# Altium PCB LEDControl1.PcbDoc (part 3 of 6)
Units mm, origin at the board's own origin, x right, y up, seen from the top; angles counter-clockwise.
Board outline 380 x 185 mm, 2 copper layers (Top Layer, Bottom Layer), stack 0.533 mm thick; 673 components, 368 nets, 1993 pads, 2553 vias.
Unrouted connection lines stored in the file: 1155.
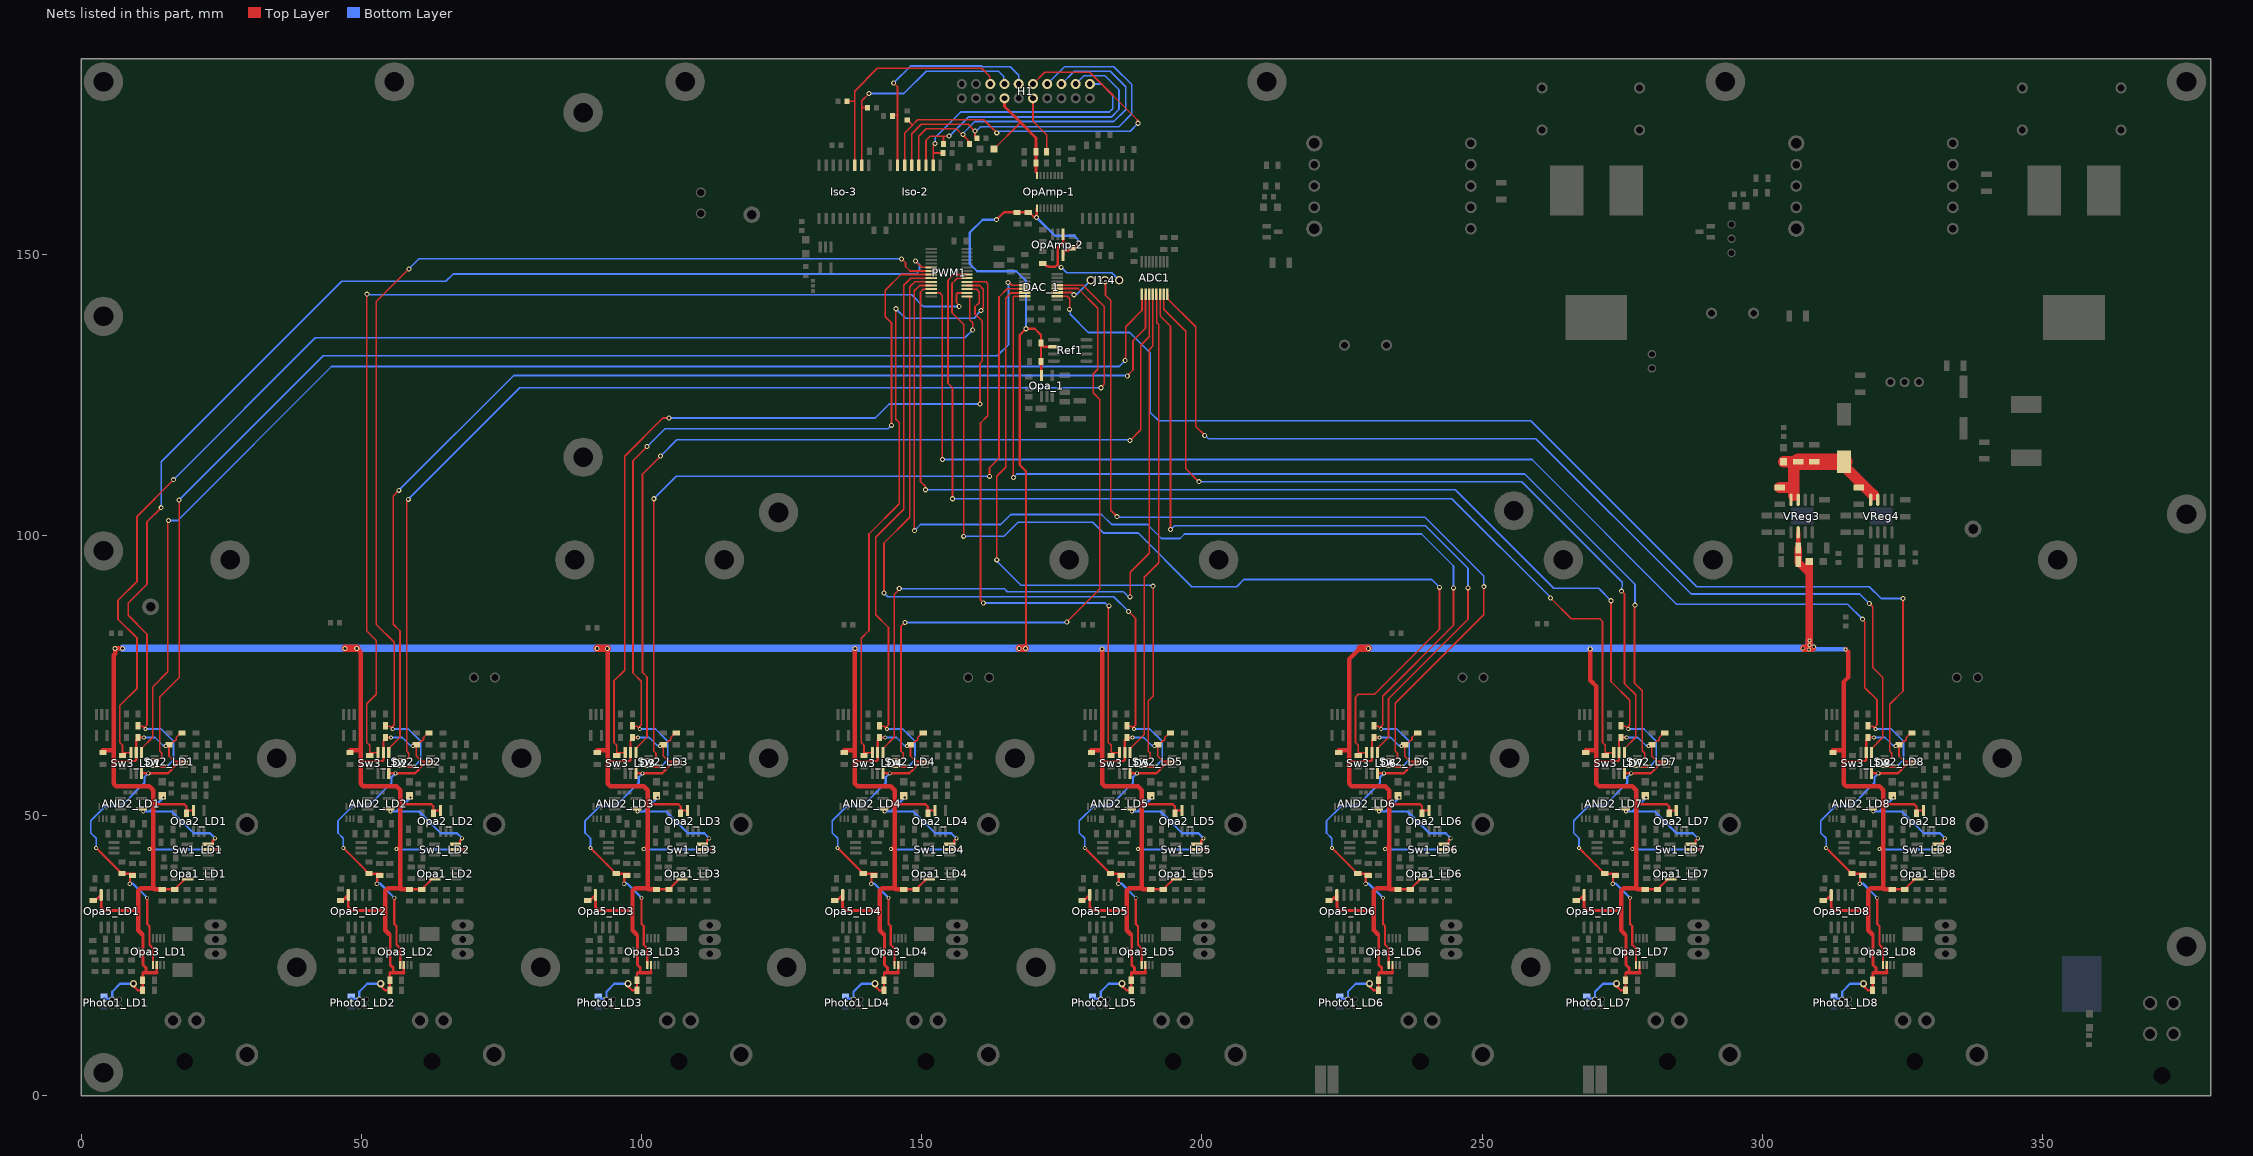
[diagram p3: the nets of this part, all layers, seen from the top]

## Via types
v1: diameter 0.7, hole 0.4, Top Layer to Bottom Layer, tented both sides, 1874 vias
v2: diameter 0.8, hole 0.5, Top Layer to Bottom Layer, tented both sides, 512 vias
v3: diameter 0.9, hole 0.5, Top Layer to Bottom Layer, tented both sides, 158 vias
v4: diameter 1.27, hole 0.711, Top Layer to Bottom Layer, tented both sides, 8 vias
v5: diameter 1.2, hole 0.7, Top Layer to Bottom Layer, tented both sides, 1 vias

## Nets (pads, with @x,y where several pads share a name; then routed paths per layer and width w, separated by ;. In a path a pad name is that pad's centre, name@x,y a point inside that pad or via, vN(x,y) a via of type N, cw(c..) or ccw(c..) an arc to the next point about the centre after c; other vN are vias at no path point) (continued)
5V: C1-7.1 C1-11.2 C1-16.2 C1-99.2 C2-17.2 C2-18.2 C3-1.1 C3-1_LD1.2 C3-1_LD2.2 C3-1_LD3.2 C3-1_LD4.2 C3-1_LD5.2 C3-1_LD6.2 C3-1_LD7.2 C3-1_LD8.2 C3-2_LD1.1 C3-2_LD2.1 C3-2_LD3.1 C3-2_LD4.1 C3-2_LD5.1 C3-2_LD6.1 C3-2_LD7.1 C3-2_LD8.1 C4-1_LD1.2 C4-1_LD2.2 C4-1_LD3.2 C4-1_LD4.2 C4-1_LD5.2 C4-1_LD6.2 C4-1_LD7.2 C4-1_LD8.2 C4-2_LD1.2 C4-2_LD2.2 C4-2_LD3.2 C4-2_LD4.2 C4-2_LD5.2 C4-2_LD6.2 C4-2_LD7.2 C4-2_LD8.2 C4-3_LD1.1 C4-3_LD2.1 C4-3_LD3.1 C4-3_LD4.1 C4-3_LD5.1 C4-3_LD6.1 C4-3_LD7.1 C4-3_LD8.1 C4-4_LD1.1 C4-4_LD2.1 C4-4_LD3.1 C4-4_LD4.1 C4-4_LD5.1 C4-4_LD6.1 C4-4_LD7.1 C4-4_LD8.1 C4-5_LD1.1 C4-5_LD2.1 C4-5_LD3.1 C4-5_LD4.1 C4-5_LD5.1 C4-5_LD6.1 C4-5_LD7.1 C4-5_LD8.1 C4-6_LD1.1 C4-6_LD2.1 C4-6_LD3.1 C4-6_LD4.1 C4-6_LD5.1 C4-6_LD6.1 C4-6_LD7.1 C4-6_LD8.1 C4-8_LD1.1 C4-8_LD2.1 C4-8_LD3.1 C4-8_LD4.1 C4-8_LD5.1 C4-8_LD6.1 C4-8_LD7.1 C4-8_LD8.1 C5-1_LD1.2 C5-1_LD2.2 C5-1_LD3.2 C5-1_LD4.2 C5-1_LD5.2 C5-1_LD6.2 C5-1_LD7.2 C5-1_LD8.2 LED1-5.2 Opa1_LD1.5 Opa1_LD2.5 Opa1_LD3.5 Opa1_LD4.5 Opa1_LD5.5 Opa1_LD6.5 Opa1_LD7.5 Opa1_LD8.5 Opa2_LD1.5 Opa2_LD2.5 Opa2_LD3.5 Opa2_LD4.5 Opa2_LD5.5 Opa2_LD6.5 Opa2_LD7.5 Opa2_LD8.5 Opa3_LD1.6 Opa3_LD2.6 Opa3_LD3.6 Opa3_LD4.6 Opa3_LD5.6 Opa3_LD6.6 Opa3_LD7.6 Opa3_LD8.6 Opa5_LD1.8 Opa5_LD2.8 Opa5_LD3.8 Opa5_LD4.8 Opa5_LD5.8 Opa5_LD6.8 Opa5_LD7.8 Opa5_LD8.8 Opa_1.5 OpAmp-1.1 OpAmp-2.5 Photo1_LD1.1 Photo1_LD2.1 Photo1_LD3.1 Photo1_LD4.1 Photo1_LD5.1 Photo1_LD6.1 Photo1_LD7.1 Photo1_LD8.1 R14-1_LD1.2 R14-1_LD2.2 R14-1_LD3.2 R14-1_LD4.2 R14-1_LD5.2 R14-1_LD6.2 R14-1_LD7.2 R14-1_LD8.2 Ref1.2 Sw1_LD1.5 Sw1_LD2.5 Sw1_LD3.5 Sw1_LD4.5 Sw1_LD5.5 Sw1_LD6.5 Sw1_LD7.5 Sw1_LD8.5 Sw2_LD1.8 Sw2_LD2.8 Sw2_LD3.8 Sw2_LD4.8 Sw2_LD5.8 Sw2_LD6.8 Sw2_LD7.8 Sw2_LD8.8 Sw3_LD1.5 Sw3_LD2.5 Sw3_LD3.5 Sw3_LD4.5 Sw3_LD5.5 Sw3_LD6.5 Sw3_LD7.5 Sw3_LD8.5 VReg3.2 | length 1666.6
  Top Layer w0.3: 5.8,59.8 5.9,59.7 ; C4-8_LD1.1@9.85,63.35 C4-8_LD1.1@9.9,63.4 ; C4-6_LD1.1@15.7,62.3 15.7,60.6 16.7,59.6 Sw2_LD1.8@18.3,59.6 ; C4-6_LD1.1@15.7,62.6 15.9,62.6 16.624,63.324 16.824,63.324 17,63.5 17,63.9 17.8,64.7 R14-1_LD1.2@18,64.7 ; 49.9,59.8 50,59.7 ; 49.9,62.625 49.925,62.6 ; C4-8_LD2.1@53.95,63.35 C4-8_LD2.1@54,63.4 ; C4-6_LD2.1@59.8,62.3 59.8,60.6 60.8,59.6 Sw2_LD2.8@62.4,59.6 ; C4-6_LD2.1@59.8,62.6 60,62.6 60.724,63.324 60.924,63.324 61.1,63.5 61.1,63.9 61.9,64.7 R14-1_LD2.2@62.1,64.7 ; 94,59.8 94.1,59.7 ; 94,62.625 94.025,62.6 ; C4-8_LD3.1@98.05,63.35 C4-8_LD3.1@98.1,63.4 ; C4-6_LD3.1@103.9,62.3 103.9,60.6 104.9,59.6 Sw2_LD3.8@106.5,59.6 ; C4-6_LD3.1@103.9,62.6 104.1,62.6 104.824,63.324 105.024,63.324 105.2,63.5 105.2,63.9 106,64.7 R14-1_LD3.2@106.2,64.7 ; 138.1,59.8 138.2,59.7 ; 138.1,62.625 138.125,62.6 ; C4-8_LD4.1@142.15,63.35 C4-8_LD4.1@142.2,63.4 ; C4-6_LD4.1@148,62.3 148,60.6 149,59.6 Sw2_LD4.8@150.6,59.6 ; C4-6_LD4.1@148,62.6 148.2,62.6 148.924,63.324 149.124,63.324 149.3,63.5 149.3,63.9 150.1,64.7 R14-1_LD4.2@150.3,64.7 ; 182.2,59.8 182.3,59.7 ; C4-8_LD5.1@186.25,63.35 C4-8_LD5.1@186.3,63.4 ; C4-6_LD5.1@192.1,62.3 192.1,60.6 193.1,59.6 Sw2_LD5.8@194.7,59.6 ; C4-6_LD5.1@192.1,62.6 192.3,62.6 193.024,63.324 193.224,63.324 193.4,63.5 193.4,63.9 194.2,64.7 R14-1_LD5.2@194.4,64.7 ; 226.3,59.8 226.4,59.7 ; C4-8_LD6.1@230.35,63.35 C4-8_LD6.1@230.4,63.4 ; C4-6_LD6.1@236.2,62.3 236.2,60.6 237.2,59.6 Sw2_LD6.8@238.8,59.6 ; C4-6_LD6.1@236.2,62.6 236.4,62.6 237.124,63.324 237.324,63.324 237.5,63.5 237.5,63.9 238.3,64.7 R14-1_LD6.2@238.5,64.7 ; 270.4,59.8 270.5,59.7 ; C4-8_LD7.1@274.45,63.35 C4-8_LD7.1@274.5,63.4 ; C4-6_LD7.1@280.3,62.3 280.3,60.6 281.3,59.6 Sw2_LD7.8@282.9,59.6 ; C4-6_LD7.1@280.3,62.6 280.5,62.6 281.224,63.324 281.424,63.324 281.6,63.5 281.6,63.9 282.4,64.7 R14-1_LD7.2@282.6,64.7 ; 314.5,59.8 314.6,59.7 ; C4-8_LD8.1@318.55,63.35 C4-8_LD8.1@318.6,63.4 ; C4-6_LD8.1@324.4,62.3 324.4,60.6 325.4,59.6 Sw2_LD8.8@327,59.6 ; C4-6_LD8.1@324.4,62.6 324.6,62.6 325.324,63.324 325.524,63.324 325.7,63.5 325.7,63.9 326.5,64.7 R14-1_LD8.2@326.7,64.7
  Top Layer w0.4: 5.9,59.7 9.674,59.7 9.85,59.876 Sw3_LD1.5@9.85,61.2 C4-8_LD1.1@9.85,63.35 ; v4(9.377,19.959) 9.543,19.792 9.543,19.393 10.136,18.8 C3-2_LD1.1@11,18.8 ; C4-8_LD1.1@10.2,63.9 v1(11.2,63.9) ; C3-2_LD1.1@11,19.1 C4-3_LD1.1@11,20.6 11,21.9 11.1,21.9 ; v1(12.2,44) 12.9,44.7 ; 12.9,51.7 13.2,52 18.4,52 18.8,51.6 C4-2_LD1.2@18.8,50.6 ; 13.5,21.9 Opa3_LD1.6@13.5,23.273 ; C4-1_LD1.2@14.5,36.8 C3-1_LD1.2@16.7,36.8 16.9,36.8 17.15,37.05 17.15,37.25 18.25,38.35 18.25,38.575 18.325,38.65 Opa1_LD1.5@19.05,38.65 ; C4-2_LD1.2@18.8,50.4 C4-2_LD1.2@18.8,50.6 ; Opa2_LD1.5@20.05,50.85 19.05,50.85 C4-2_LD1.2@18.8,50.6 ; Sw1_LD1.5@22.7,43.9 v1(24.6,43.9) ; 50,59.7 53.774,59.7 53.95,59.876 Sw3_LD2.5@53.95,61.2 C4-8_LD2.1@53.95,63.35 ; v4(53.477,19.959) 53.643,19.792 53.643,19.393 54.236,18.8 C3-2_LD2.1@55.1,18.8 ; C4-8_LD2.1@54.3,63.9 v1(55.3,63.9) ; C3-2_LD2.1@55.1,19.1 C4-3_LD2.1@55.1,20.6 55.1,21.9 55.2,21.9 ; v1(56.3,44) 57,44.7 ; 57,51.7 57.3,52 62.5,52 62.9,51.6 C4-2_LD2.2@62.9,50.6 ; 57.6,21.9 Opa3_LD2.6@57.6,23.273 ; C4-1_LD2.2@58.6,36.8 C3-1_LD2.2@60.8,36.8 61,36.8 61.25,37.05 61.25,37.25 62.35,38.35 62.35,38.575 62.425,38.65 Opa1_LD2.5@63.15,38.65 ; C4-2_LD2.2@62.9,50.4 C4-2_LD2.2@62.9,50.6 ; Opa2_LD2.5@64.15,50.85 63.15,50.85 C4-2_LD2.2@62.9,50.6 ; Sw1_LD2.5@66.8,43.9 v1(68.7,43.9) ; 94.1,59.7 97.874,59.7 98.05,59.876 Sw3_LD3.5@98.05,61.2 C4-8_LD3.1@98.05,63.35 ; v4(97.577,19.959) 97.743,19.792 97.743,19.393 98.336,18.8 C3-2_LD3.1@99.2,18.8 ; C4-8_LD3.1@98.4,63.9 v1(99.4,63.9) ; C3-2_LD3.1@99.2,19.1 C4-3_LD3.1@99.2,20.6 99.2,21.9 99.3,21.9 ; v1(100.4,44) 101.1,44.7 ; 101.1,51.7 101.4,52 106.6,52 107,51.6 C4-2_LD3.2@107,50.6 ; 101.7,21.9 Opa3_LD3.6@101.7,23.273 ; C4-1_LD3.2@102.7,36.8 C3-1_LD3.2@104.9,36.8 105.1,36.8 105.35,37.05 105.35,37.25 106.45,38.35 106.45,38.575 106.525,38.65 Opa1_LD3.5@107.25,38.65 ; C4-2_LD3.2@107,50.4 C4-2_LD3.2@107,50.6 ; Opa2_LD3.5@108.25,50.85 107.25,50.85 C4-2_LD3.2@107,50.6 ; Sw1_LD3.5@110.9,43.9 v1(112.8,43.9) ; 138.2,59.7 141.974,59.7 142.15,59.876 Sw3_LD4.5@142.15,61.2 C4-8_LD4.1@142.15,63.35 ; v4(141.677,19.959) 141.843,19.792 141.843,19.393 142.436,18.8 C3-2_LD4.1@143.3,18.8 ; C4-8_LD4.1@142.5,63.9 v1(143.5,63.9) ; C3-2_LD4.1@143.3,19.1 C4-3_LD4.1@143.3,20.6 143.3,21.9 143.4,21.9 ; v1(144.5,44) 145.2,44.7 ; 145.2,51.7 145.5,52 150.7,52 151.1,51.6 C4-2_LD4.2@151.1,50.6 ; 145.8,21.9 Opa3_LD4.6@145.8,23.273 ; C4-1_LD4.2@146.8,36.8 C3-1_LD4.2@149,36.8 149.2,36.8 149.45,37.05 149.45,37.25 150.55,38.35 150.55,38.575 150.625,38.65 Opa1_LD4.5@151.35,38.65 ; C4-2_LD4.2@151.1,50.4 C4-2_LD4.2@151.1,50.6 ; Opa2_LD4.5@152.35,50.85 151.35,50.85 C4-2_LD4.2@151.1,50.6 ; Sw1_LD4.5@155,43.9 v1(156.9,43.9) ; v3(163.372,156.29) 164.682,157.6 C3-1.1@167,157.6 C1-7.1@169,157.6 169.2,157.6 170.004,156.796 170.404,156.796 v3(170.5,156.7) 170.551,156.751 170.551,158.319 OpAmp-1.1@170.56,158.329 ; v3(168.5,79.8) 168.6,79.9 168.6,111.4 167.5,112.5 167.5,135.734 v3(168.6,136.834) 170.166,136.834 171.3,135.7 C1-11.2@171.3,134.3 C1-11.2@171.3,134.1 ; Opa_1.5@171.4,128.5 171.35,128.55 171.35,130.95 C1-16.2@171.3,131 C1-11.2@171.3,134.1 ; Ref1.2@173.6,133.6 171.8,133.6 C1-11.2@171.3,134.1 ; OpAmp-2.5@175.25,149.95 175.25,150.675 175.325,150.75 176.05,150.75 176.25,150.95 176.65,150.95 C1-99.2@176.9,151.2 177.1,151.2 v3@177.704,151.804 ; 182.3,59.7 186.074,59.7 186.25,59.876 Sw3_LD5.5@186.25,61.2 C4-8_LD5.1@186.25,63.35 ; v4(185.777,19.959) 185.943,19.792 185.943,19.393 186.536,18.8 C3-2_LD5.1@187.4,18.8 ; C4-8_LD5.1@186.6,63.9 v1(187.6,63.9) ; C3-2_LD5.1@187.4,19.1 C4-3_LD5.1@187.4,20.6 187.4,21.9 187.5,21.9 ; v1(188.6,44) 189.3,44.7 ; 189.3,51.7 189.6,52 194.8,52 195.2,51.6 C4-2_LD5.2@195.2,50.6 ; 189.9,21.9 Opa3_LD5.6@189.9,23.273 ; C4-1_LD5.2@190.9,36.8 C3-1_LD5.2@193.1,36.8 193.3,36.8 193.55,37.05 193.55,37.25 194.65,38.35 194.65,38.575 194.725,38.65 Opa1_LD5.5@195.45,38.65 ; C4-2_LD5.2@195.2,50.4 C4-2_LD5.2@195.2,50.6 ; Opa2_LD5.5@196.45,50.85 195.45,50.85 C4-2_LD5.2@195.2,50.6 ; Sw1_LD5.5@199.1,43.9 v1(201,43.9) ; 226.4,59.7 230.174,59.7 230.35,59.876 Sw3_LD6.5@230.35,61.2 C4-8_LD6.1@230.35,63.35 ; v4(229.877,19.959) 230.043,19.792 230.043,19.393 230.636,18.8 C3-2_LD6.1@231.5,18.8 ; C4-8_LD6.1@230.7,63.9 v1(231.7,63.9) ; C3-2_LD6.1@231.5,19.1 C4-3_LD6.1@231.5,20.6 231.5,21.9 231.6,21.9 ; v1(232.7,44) 233.4,44.7 ; 233.4,51.7 233.7,52 238.9,52 239.3,51.6 C4-2_LD6.2@239.3,50.6 ; 234,21.9 Opa3_LD6.6@234,23.273 ; C4-1_LD6.2@235,36.8 C3-1_LD6.2@237.2,36.8 237.4,36.8 237.65,37.05 237.65,37.25 238.75,38.35 238.75,38.575 238.825,38.65 Opa1_LD6.5@239.55,38.65 ; C4-2_LD6.2@239.3,50.4 C4-2_LD6.2@239.3,50.6 ; Opa2_LD6.5@240.55,50.85 239.55,50.85 C4-2_LD6.2@239.3,50.6 ; Sw1_LD6.5@243.2,43.9 v1(245.1,43.9) ; 270.5,59.7 274.274,59.7 274.45,59.876 Sw3_LD7.5@274.45,61.2 C4-8_LD7.1@274.45,63.35 ; v4(273.977,19.959) 274.143,19.792 274.143,19.393 274.736,18.8 C3-2_LD7.1@275.6,18.8 ; C4-8_LD7.1@274.8,63.9 v1(275.8,63.9) ; C3-2_LD7.1@275.6,19.1 C4-3_LD7.1@275.6,20.6 275.6,21.9 275.7,21.9 ; v1(276.8,44) 277.5,44.7 ; 277.5,51.7 277.8,52 283,52 283.4,51.6 C4-2_LD7.2@283.4,50.6 ; 278.1,21.9 Opa3_LD7.6@278.1,23.273 ; C4-1_LD7.2@279.1,36.8 C3-1_LD7.2@281.3,36.8 281.5,36.8 281.75,37.05 281.75,37.25 282.85,38.35 282.85,38.575 282.925,38.65 Opa1_LD7.5@283.65,38.65 ; C4-2_LD7.2@283.4,50.4 C4-2_LD7.2@283.4,50.6 ; Opa2_LD7.5@284.65,50.85 283.65,50.85 C4-2_LD7.2@283.4,50.6 ; Sw1_LD7.5@287.3,43.9 v1(289.2,43.9) ; 314.6,59.7 318.374,59.7 318.55,59.876 Sw3_LD8.5@318.55,61.2 C4-8_LD8.1@318.55,63.35 ; v4(318.077,19.959) 318.243,19.792 318.243,19.393 318.836,18.8 C3-2_LD8.1@319.7,18.8 ; C4-8_LD8.1@318.9,63.9 v1(319.9,63.9) ; C3-2_LD8.1@319.7,19.1 C4-3_LD8.1@319.7,20.6 319.7,21.9 319.8,21.9 ; v1(320.9,44) 321.6,44.7 ; 321.6,51.7 321.9,52 327.1,52 327.5,51.6 C4-2_LD8.2@327.5,50.6 ; 322.2,21.9 Opa3_LD8.6@322.2,23.273 ; C4-1_LD8.2@323.2,36.8 C3-1_LD8.2@325.4,36.8 325.6,36.8 325.85,37.05 325.85,37.25 326.95,38.35 326.95,38.575 327.025,38.65 Opa1_LD8.5@327.75,38.65 ; C4-2_LD8.2@327.5,50.4 C4-2_LD8.2@327.5,50.6 ; Opa2_LD8.5@328.75,50.85 327.75,50.85 C4-2_LD8.2@327.5,50.6 ; Sw1_LD8.5@331.4,43.9 v1(333.3,43.9)
  Top Layer w0.5: C4-5_LD1.1@2.1,34.7 ccw(c2.1,35.642) 2.766,34.976 Opa5_LD1.8@3.59,35.8 3.59,33.61 4.184,33.016 10.2,33.016 ; 10.9,28.8 11.075,28.625 11.075,23.325 11.6,22.8 11.6,21.9 ; C4-5_LD2.1@46.2,34.7 ccw(c46.2,35.642) 46.866,34.976 Opa5_LD2.8@47.69,35.8 47.69,33.61 48.284,33.016 54.3,33.016 ; 55,28.8 55.175,28.625 55.175,23.325 55.7,22.8 55.7,21.9 ; C4-5_LD3.1@90.3,34.7 ccw(c90.3,35.642) 90.966,34.976 Opa5_LD3.8@91.79,35.8 91.79,33.61 92.384,33.016 98.4,33.016 ; 99.1,28.8 99.275,28.625 99.275,23.325 99.8,22.8 99.8,21.9 ; C4-5_LD4.1@134.4,34.7 ccw(c134.4,35.642) 135.066,34.976 Opa5_LD4.8@135.89,35.8 135.89,33.61 136.484,33.016 142.5,33.016 ; 143.2,28.8 143.375,28.625 143.375,23.325 143.9,22.8 143.9,21.9 ; C4-5_LD5.1@178.5,34.7 ccw(c178.5,35.642) 179.166,34.976 Opa5_LD5.8@179.99,35.8 179.99,33.61 180.584,33.016 186.6,33.016 ; 187.3,28.8 187.475,28.625 187.475,23.325 188,22.8 188,21.9 ; C4-5_LD6.1@222.6,34.7 ccw(c222.6,35.642) 223.266,34.976 Opa5_LD6.8@224.09,35.8 224.09,33.61 224.684,33.016 230.7,33.016 ; 231.4,28.8 231.575,28.625 231.575,23.325 232.1,22.8 232.1,21.9 ; C4-5_LD7.1@266.7,34.7 ccw(c266.7,35.642) 267.366,34.976 Opa5_LD7.8@268.19,35.8 268.19,33.61 268.784,33.016 274.8,33.016 ; 275.5,28.8 275.675,28.625 275.675,23.325 276.2,22.8 276.2,21.9 ; C4-5_LD8.1@310.8,34.7 ccw(c310.8,35.642) 311.466,34.976 Opa5_LD8.8@312.29,35.8 312.29,33.61 312.884,33.016 318.9,33.016 ; 319.6,28.8 319.775,28.625 319.775,23.325 320.3,22.8 320.3,21.9
  Top Layer w0.6: 11.1,21.9 11.6,21.9 13.5,21.9 ; 55.2,21.9 55.7,21.9 57.6,21.9 ; 99.3,21.9 99.8,21.9 101.7,21.9 ; 143.4,21.9 143.9,21.9 145.8,21.9 ; 187.5,21.9 188,21.9 189.9,21.9 ; 231.6,21.9 232.1,21.9 234,21.9 ; 275.7,21.9 276.2,21.9 278.1,21.9 ; 319.8,21.9 320.3,21.9 322.2,21.9
  Top Layer w0.8: C5-1_LD1.2@3.9,61.6 5.7,61.6 5.8,61.7 ; v3(7.4,79.8) 7.39,79.79 6.09,79.79 v3(6.081,79.781) 6.081,78.881 5.8,78.6 5.8,61.7 ; 10.9,28.8 10.2,29.5 10.2,33.016 10.2,36.531 10.669,37 12.9,37 ; C4-1_LD1.2@14.5,36.8 14.45,36.85 13.05,36.85 12.9,37 ; C5-1_LD2.2@48,61.6 49.8,61.6 49.9,61.7 ; v3(49.2,79.8) 49.9,79.1 49.9,62.625 49.9,61.7 ; 55,28.8 54.3,29.5 54.3,33.016 54.3,36.531 54.769,37 57,37 ; C4-1_LD2.2@58.6,36.8 58.55,36.85 57.15,36.85 57,37 ; C5-1_LD3.2@92.1,61.6 93.9,61.6 94,61.7 ; v3(93.9,79.8) 94,79.7 94,62.625 94,61.7 ; 99.1,28.8 98.4,29.5 98.4,33.016 98.4,36.531 98.869,37 101.1,37 ; C4-1_LD3.2@102.7,36.8 102.65,36.85 101.25,36.85 101.1,37 ; C5-1_LD4.2@136.2,61.6 138,61.6 138.1,61.7 ; v3(138.1,79.8) 138.2,79.8 138.1,79.7 138.1,62.625 138.1,61.7 ; 143.2,28.8 142.5,29.5 142.5,33.016 142.5,36.531 142.969,37 145.2,37 ; C4-1_LD4.2@146.8,36.8 146.75,36.85 145.35,36.85 145.2,37 ; C5-1_LD5.2@180.3,61.6 182.1,61.6 182.2,61.7 ; v3(182.2,79.7) 182.2,61.7 ; 187.3,28.8 186.6,29.5 186.6,33.016 186.6,36.531 187.069,37 189.3,37 ; C4-1_LD5.2@190.9,36.8 190.85,36.85 189.45,36.85 189.3,37 ; C5-1_LD6.2@224.4,61.6 226.2,61.6 226.3,61.7 ; 228.25,79.8 228.2,79.8 226.3,77.9 226.3,61.7 ; 231.4,28.8 230.7,29.5 230.7,33.016 230.7,36.531 231.169,37 233.4,37 ; C4-1_LD6.2@235,36.8 234.95,36.85 233.55,36.85 233.4,37 ; C5-1_LD7.2@268.5,61.6 270.3,61.6 270.4,61.7 ; v3(269.3,79.7) 269.3,74.1 270.4,73 270.4,61.7 ; 275.5,28.8 274.8,29.5 274.8,33.016 274.8,36.531 275.269,37 277.5,37 ; C4-1_LD7.2@279.1,36.8 279.05,36.85 277.65,36.85 277.5,37 ; C2-18.2@306.4,97.7 VReg3.2@306.4,100.5 ; C5-1_LD8.2@312.6,61.6 314.4,61.6 314.5,61.7 ; v1(314.856,79.6) 315.3,79.156 315.3,74.6 314.5,73.8 314.5,61.7 ; 319.6,28.8 318.9,29.5 318.9,33.016 318.9,36.531 319.369,37 321.6,37 ; C4-1_LD8.2@323.2,36.8 323.15,36.85 321.75,36.85 321.6,37 ; 5.8,61.7 5.8,59.8 5.8,55.669 6.269,55.2 12.2,55.2 12.9,54.5 12.9,51.7 12.9,44.7 12.9,37 ; 49.9,61.7 49.9,59.8 49.9,55.669 50.369,55.2 56.3,55.2 57,54.5 57,51.7 57,44.7 57,37 ; 94,61.7 94,59.8 94,55.669 94.469,55.2 100.4,55.2 101.1,54.5 101.1,51.7 101.1,44.7 101.1,37 ; 138.1,61.7 138.1,59.8 138.1,55.669 138.569,55.2 144.5,55.2 145.2,54.5 145.2,51.7 145.2,44.7 145.2,37 ; 182.2,61.7 182.2,59.8 182.2,55.669 182.669,55.2 188.6,55.2 189.3,54.5 189.3,51.7 189.3,44.7 189.3,37 ; 226.3,61.7 226.3,59.8 226.3,55.669 226.769,55.2 232.7,55.2 233.4,54.5 233.4,51.7 233.4,44.7 233.4,37 ; 270.4,61.7 270.4,59.8 270.4,55.669 270.869,55.2 276.8,55.2 277.5,54.5 277.5,51.7 277.5,44.7 277.5,37 ; 314.5,61.7 314.5,59.8 314.5,55.669 314.969,55.2 320.9,55.2 321.6,54.5 321.6,52 321.6,51.7 321.6,44.7 321.6,37
  Top Layer w1.3: v3(47.1,79.8) v3(49.2,79.8) ; v3(92.1,79.8) v3(93.9,79.8) v3@93.95,79.75 ; v3(167.4,79.8) 167.7,79.8 v3(168.5,79.8) ; 228.25,79.8 v3(229.7,79.8) ; C2-18.2@306.4,97.7 C2-17.2@306.4,95.3 306.4,95.15 308.15,93.4 308.4,93.4 ; v1@307.4,79.8 308.9,79.8 ; v1@308.4,79.8 308.4,93.4 ; LED1-5.2@308.4,95.3 308.4,93.4
  Bottom Layer w0.3: v1(11.2,63.9) 13.2,63.9 14.634,62.466 15.034,62.466 v1(15.1,62.4) ; v1(55.3,63.9) 57.3,63.9 58.734,62.466 59.134,62.466 v1(59.2,62.4) ; v1(99.4,63.9) 101.4,63.9 102.834,62.466 103.234,62.466 v1(103.3,62.4) ; v1(143.5,63.9) 145.5,63.9 146.934,62.466 147.334,62.466 v1(147.4,62.4) ; v1(187.6,63.9) 189.6,63.9 191.034,62.466 191.434,62.466 v1(191.5,62.4) ; v1(231.7,63.9) 233.7,63.9 235.134,62.466 235.534,62.466 v1(235.6,62.4) ; v1(275.8,63.9) 277.8,63.9 279.234,62.466 279.634,62.466 v1(279.7,62.4) ; v1(319.9,63.9) 321.9,63.9 323.334,62.466 323.734,62.466 v1(323.8,62.4)
  Bottom Layer w0.4: C4-4_LD1.1@4.1,17.5 4.335,17.265 5.435,17.265 Photo1_LD1.1@5.55,17.15 5.55,18.55 6.959,19.959 v4(9.377,19.959) ; v1(12.2,44) 12.281,44 12.381,43.9 v1(24.6,43.9) ; C4-4_LD2.1@48.2,17.5 48.435,17.265 49.535,17.265 Photo1_LD2.1@49.65,17.15 49.65,18.55 51.059,19.959 v4(53.477,19.959) ; v1(56.3,44) 56.381,44 56.481,43.9 v1(68.7,43.9) ; C4-4_LD3.1@92.3,17.5 92.535,17.265 93.635,17.265 Photo1_LD3.1@93.75,17.15 93.75,18.55 95.159,19.959 v4(97.577,19.959) ; v1(100.4,44) 100.481,44 100.581,43.9 v1(112.8,43.9) ; C4-4_LD4.1@136.4,17.5 136.635,17.265 137.735,17.265 Photo1_LD4.1@137.85,17.15 137.85,18.55 139.259,19.959 v4(141.677,19.959) ; v1(144.5,44) 144.581,44 144.681,43.9 v1(156.9,43.9) ; v3(163.372,156.29) 160.89,156.29 158.6,154 158.6,148.4 159.9,147.1 166.9,147.1 168.6,145.4 v3(168.6,136.834) ; v3(170.5,156.7) 173.793,153.407 177.213,153.407 177.904,152.716 177.904,151.996 v3@178,151.9 ; C4-4_LD5.1@180.5,17.5 180.735,17.265 181.835,17.265 Photo1_LD5.1@181.95,17.15 181.95,18.55 183.359,19.959 v4(185.777,19.959) ; v1(188.6,44) 188.681,44 188.781,43.9 v1(201,43.9) ; C4-4_LD6.1@224.6,17.5 224.835,17.265 225.935,17.265 Photo1_LD6.1@226.05,17.15 226.05,18.55 227.459,19.959 v4(229.877,19.959) ; v1(232.7,44) 232.781,44 232.881,43.9 v1(245.1,43.9) ; C4-4_LD7.1@268.7,17.5 268.935,17.265 270.035,17.265 Photo1_LD7.1@270.15,17.15 270.15,18.55 271.559,19.959 v4(273.977,19.959) ; v1(276.8,44) 276.881,44 276.981,43.9 v1(289.2,43.9) ; C4-4_LD8.1@312.8,17.5 313.035,17.265 314.135,17.265 Photo1_LD8.1@314.25,17.15 314.25,18.55 315.659,19.959 v4(318.077,19.959) ; v1(320.9,44) 320.981,44 321.081,43.9 v1(333.3,43.9)
  Bottom Layer w0.8: v3(6.081,79.781) 6.1,79.8 6.11,79.79 7.39,79.79 v3(7.4,79.8) ; v1@309,79.9 309.3,79.6 v1(314.856,79.6)
  Bottom Layer w1.3: v3(7.4,79.8) v3(47.1,79.8) ; 267.7,79.8 v3(229.7,79.8) 228.3,79.8 182.2,79.8 v3(168.5,79.8) v3(167.4,79.8) 167.3,79.8 v3(138.1,79.8) v3(93.9,79.8) v3(92.1,79.8) v3(49.2,79.8) ; 267.727,79.827 v3@269.273,79.827 ; v3@269.3,79.8 v1@309.15,79.8 ; v1(308.4,80.4) v1(308.4,81.2) ; v3(47.1,79.8) v3(49.2,79.8) ; v3(47.1,79.8) v3(49.2,79.8)
  other v1: 308.3,79.6 307.2,79.8 309.2,80.1
  other v3: 178.1,152
5V_IN: C1-8.2 C3-2.2 H1.17 LED-8.2 OpAmp-1.16 | length 23
  Top Layer w0.3: LED-8.2@162.9,168.9 167.5,173.5 167.8,173.5 ; OpAmp-1.16@170.4,164.775 170.56,164.615 OpAmp-1.16@170.56,164.171
  Top Layer w0.5: H1.17@164.78,177.96 164.78,176.52 167.8,173.5 170.4,170.9 C3-2.2@170.4,168.4 C1-8.2@170.4,166.4 OpAmp-1.16@170.4,164.775
6V5: C2-6.1 C2-15.1 C2-21.1 F1.2 LED1-6.2 R6-1.2 VReg3.7 VReg3.8 VReg4.7 VReg4.8 | length 27.8
  Top Layer w2: C2-21.1@303.1,108.5 305.5,108.5 305.6,108.4 ; LED1-6.2@303.8,113.1 304.6,113.1 R6-1.2@306.4,113.1 305.6,112.3 305.6,108.4 ; 305.6,107.1 305.6,108.4 ; F1.2@314.6,113.1 314.6,112.35 319.75,107.2 319.8,107.2
  Top Layer w3: R6-1.2@306.4,113.1 C2-15.1@309.3,113.1 F1.2@314.6,113.1
Active_LD1: AND2_LD1.4 LEDC_1_LD1.2 Sw1_LD1.6 | length 20.3
  Top Layer w0.4: Sw1_LD1.6@22.7,44.85 23.425,44.85 23.5,44.925 23.5,45.5 v1(23.9,45.9)
  Bottom Layer w0.4: v1(11.1,50.7) 12.2,50.7 ; v1(14.7,53.2) 12.2,50.7 ; v1(23.9,45.9) 23,46.8 20.1,46.8 16.2,50.7 12.2,50.7
Active_LD2: AND2_LD2.4 LEDC_1_LD2.2 Sw1_LD2.6 | length 20.3
  Top Layer w0.4: Sw1_LD2.6@66.8,44.85 67.525,44.85 67.6,44.925 67.6,45.5 v1(68,45.9)
  Bottom Layer w0.4: v1(55.2,50.7) 56.3,50.7 ; v1(58.8,53.2) 56.3,50.7 ; v1(68,45.9) 67.1,46.8 64.2,46.8 60.3,50.7 56.3,50.7
Active_LD3: AND2_LD3.4 LEDC_1_LD3.2 Sw1_LD3.6 | length 20.3
  Top Layer w0.4: Sw1_LD3.6@110.9,44.85 111.625,44.85 111.7,44.925 111.7,45.5 v1(112.1,45.9)
  Bottom Layer w0.4: v1(99.3,50.7) 100.4,50.7 ; v1(102.9,53.2) 100.4,50.7 ; v1(112.1,45.9) 111.2,46.8 108.3,46.8 104.4,50.7 100.4,50.7
Active_LD4: AND2_LD4.4 LEDC_1_LD4.2 Sw1_LD4.6 | length 20.3
  Top Layer w0.4: Sw1_LD4.6@155,44.85 155.725,44.85 155.8,44.925 155.8,45.5 v1(156.2,45.9)
  Bottom Layer w0.4: v1(143.4,50.7) 144.5,50.7 ; v1(147,53.2) 144.5,50.7 ; v1(156.2,45.9) 155.3,46.8 152.4,46.8 148.5,50.7 144.5,50.7
Active_LD5: AND2_LD5.4 LEDC_1_LD5.2 Sw1_LD5.6 | length 20.3
  Top Layer w0.4: Sw1_LD5.6@199.1,44.85 199.825,44.85 199.9,44.925 199.9,45.5 v1(200.3,45.9)
  Bottom Layer w0.4: v1(187.5,50.7) 188.6,50.7 ; v1(191.1,53.2) 188.6,50.7 ; v1(200.3,45.9) 199.4,46.8 196.5,46.8 192.6,50.7 188.6,50.7
Active_LD6: AND2_LD6.4 LEDC_1_LD6.2 Sw1_LD6.6 | length 20.3
  Top Layer w0.4: Sw1_LD6.6@243.2,44.85 243.925,44.85 244,44.925 244,45.5 v1(244.4,45.9)
  Bottom Layer w0.4: v1(231.6,50.7) 232.7,50.7 ; v1(235.2,53.2) 232.7,50.7 ; v1(244.4,45.9) 243.5,46.8 240.6,46.8 236.7,50.7 232.7,50.7
Active_LD7: AND2_LD7.4 LEDC_1_LD7.2 Sw1_LD7.6 | length 20.3
  Top Layer w0.4: Sw1_LD7.6@287.3,44.85 288.025,44.85 288.1,44.925 288.1,45.5 v1(288.5,45.9)
  Bottom Layer w0.4: v1(275.7,50.7) 276.8,50.7 ; v1(279.3,53.2) 276.8,50.7 ; v1(288.5,45.9) 287.6,46.8 284.7,46.8 280.8,50.7 276.8,50.7
Active_LD8: AND2_LD8.4 LEDC_1_LD8.2 Sw1_LD8.6 | length 20.3
  Top Layer w0.4: Sw1_LD8.6@331.4,44.85 332.125,44.85 332.2,44.925 332.2,45.5 v1(332.6,45.9)
  Bottom Layer w0.4: v1(319.8,50.7) 320.9,50.7 ; v1(323.4,53.2) 320.9,50.7 ; v1(332.6,45.9) 331.7,46.8 328.8,46.8 324.9,50.7 320.9,50.7
ADC1: ADC1.1 Sw3_LD1.4 | length 239
  Top Layer w0.3: Sw3_LD1.4@10.8,61.2 10.8,61.925 12.8,63.925 12.8,72.9 15.5,75.6 15.5,102.5 v3(15.6,102.6) ; v3(186.313,131.179) 186.4,131.266 186.4,137.2 189.3,140.1 ADC1.1@189.3,143
  Bottom Layer w0.3: v3(15.6,102.6) 17.2,102.6 44.7,130.1 185.234,130.1 v3(186.313,131.179)
ADC2: ADC1.2 Sw3_LD2.4 | length 203
  Top Layer w0.3: Sw3_LD2.4@54.9,61.2 54.9,61.925 56.9,63.925 56.9,82.9 55.7,84.1 55.7,107 v3(56.7,108) ; v3(186.7,128.4) 186.7,128.473 187.7,129.473 187.7,134.7 189.95,136.95 ADC1.2@189.95,143
  Bottom Layer w0.3: v3(56.7,108) 77.2,128.5 186.6,128.5 v3(186.7,128.4)
ADC3: ADC1.3 Sw3_LD3.4 | length 167.9
  Top Layer w0.3: Sw3_LD3.4@99,61.2 99,61.925 101,63.925 101,74.7 100.2,75.5 100.2,110.9 v3(103.4,114.1) ; v3(187.2,116.9) 189.1,118.8 189.1,133.9 190.6,135.4 ADC1.3@190.6,143
  Bottom Layer w0.3: v3(103.4,114.1) 106.3,117 187.1,117 v3(187.2,116.9)
ADC4: ADC1.4 Sw3_LD4.4 | length 127.9
  Top Layer w0.3: Sw3_LD4.4@143.1,61.2 143.1,61.925 145.1,63.925 145.1,89.4 146,90.3 v3(146,90.456) ; v3(187.2,89) 187.2,93.4 190.6,96.8 190.6,133.1 191.25,133.75 ADC1.4@191.25,143
  Bottom Layer w0.3: v3(146,90.456) 164.744,90.456 164.899,90.301 165.3,89.9 186,89.9 186.9,89 v3(187.2,89)
ADC5: ADC1.5 Sw3_LD5.4 | length 84.1
  Top Layer w0.3: Sw3_LD5.4@187.2,61.2 187.2,61.925 189.7,64.425 189.7,92.5 192.3,95.1 192.3,137.593 191.975,137.918 191.975,142.925 ADC1.5@191.9,143
ADC6: ADC1.6 Sw3_LD6.4 | length 138.9
  Top Layer w0.3: ADC1.6@192.55,143 192.55,139.11 194.4,137.26 v3(194.4,101) ; Sw3_LD6.4@231.3,61.2 231.3,61.925 233.3,63.925 233.3,70.8 247.5,85 v3(247.5,90.6)
  Bottom Layer w0.3: v3(194.4,101) 195.1,101.7 239.9,101.7 247.5,94.1 v3(247.5,90.6)
ADC7: ADC1.7 Sw3_LD7.4 | length 151.3
  Top Layer w0.3: ADC1.7@193.2,143 193.2,140.3 197.1,136.4 197.1,111.908 v3(199.464,109.544) ; v3(274.9,90) 274.924,90 275.4,89.524 275.4,73.5 277.4,71.5 277.4,63.925 275.4,61.925 Sw3_LD7.4@275.4,61.2
  Bottom Layer w0.3: v3(199.464,109.544) 257.056,109.544 275.03,91.57 v3(274.9,90)
ADC8: ADC1.8 Sw3_LD8.4 | length 187.4
  Top Layer w0.3: ADC1.8@193.85,143 193.925,142.925 193.925,142.15 198.9,137.175 198.9,119.4 v3(200.5,117.8) ; v3(319.1,87.8) 319.7,87.2 319.7,76.4 321.5,74.6 321.5,63.925 319.5,61.925 Sw3_LD8.4@319.5,61.2
  Bottom Layer w0.3: v3(200.5,117.8) 200.573,117.8 201.173,117.2 259.6,117.2 287.3,89.5 317.4,89.5 v3(319.1,87.8)
CurrentSense_LD1: Opa3_LD1.5 R11-1_LD1.1 S.2@9.2,39.3 Sw2_LD1.7 Sw3_LD1.3 | length 54.9
  Top Layer w0.3: Sw3_LD1.3@10.8,57.45 10.8,57.026 Sw3_LD1.3@10.925,56.901 ; 16.1,58.1 17.1,59.1 Sw2_LD1.7@18.3,59.1
  Top Layer w0.4: v1(2.7,44.2) 3.379,43.521 5.7,41.2 R11-1_LD1.1@7.3,39.6 ; R11-1_LD1.1@7.8,39.6 S.2@9.6,39.6 ; v2(8.7,37.8) 8.75,37.85 S.2@8.75,39.35 ; Sw3_LD1.3@10.8,57.45 10.85,57.5 v1(12,57.5) 15.5,57.5 16.1,58.1 ; v1(11.8,35.3) 11.8,30.6 12.196,30.204 12.196,26.904 12.85,26.25 Opa3_LD1.5@12.85,23.273
  Bottom Layer w0.3: v1(2.7,44.2) 2.7,45.9 1.74,46.86 1.74,49.047 4.341,51.648 7.148,51.648 11.3,55.8
  Bottom Layer w0.4: v2@8.65,37.85 9.25,37.85 v1(11.8,35.3) ; 11.3,55.8 11.3,56.8 v1(12,57.5)
CurrentSense_LD2: Opa3_LD2.5 R11-1_LD2.1 S.2@53.3,39.3 Sw2_LD2.7 Sw3_LD2.3 | length 54.9
  Top Layer w0.3: Sw3_LD2.3@54.9,57.45 54.9,57.026 Sw3_LD2.3@55.025,56.901 ; 60.2,58.1 61.2,59.1 Sw2_LD2.7@62.4,59.1
  Top Layer w0.4: v1(46.8,44.2) 47.479,43.521 49.8,41.2 R11-1_LD2.1@51.4,39.6 ; R11-1_LD2.1@51.9,39.6 S.2@53.7,39.6 ; v2(52.8,37.8) 52.85,37.85 S.2@52.85,39.35 ; Sw3_LD2.3@54.9,57.45 54.95,57.5 v1(56.1,57.5) 59.6,57.5 60.2,58.1 ; v1(55.9,35.3) 55.9,30.6 56.296,30.204 56.296,26.904 56.95,26.25 Opa3_LD2.5@56.95,23.273
  Bottom Layer w0.3: v1(46.8,44.2) 46.8,45.9 45.84,46.86 45.84,49.047 48.441,51.648 51.248,51.648 55.4,55.8
  Bottom Layer w0.4: v2@52.75,37.85 53.35,37.85 v1(55.9,35.3) ; 55.4,55.8 55.4,56.8 v1(56.1,57.5)
CurrentSense_LD3: Opa3_LD3.5 R11-1_LD3.1 S.2@97.4,39.3 Sw2_LD3.7 Sw3_LD3.3 | length 54.9
  Top Layer w0.3: Sw3_LD3.3@99,57.45 99,57.026 Sw3_LD3.3@99.125,56.901 ; 104.3,58.1 105.3,59.1 Sw2_LD3.7@106.5,59.1
  Top Layer w0.4: v1(90.9,44.2) 91.579,43.521 93.9,41.2 R11-1_LD3.1@95.5,39.6 ; R11-1_LD3.1@96,39.6 S.2@97.8,39.6 ; v2(96.9,37.8) 96.95,37.85 S.2@96.95,39.35 ; Sw3_LD3.3@99,57.45 99.05,57.5 v1(100.2,57.5) 103.7,57.5 104.3,58.1 ; v1(100,35.3) 100,30.6 100.396,30.204 100.396,26.904 101.05,26.25 Opa3_LD3.5@101.05,23.273
  Bottom Layer w0.3: v1(90.9,44.2) 90.9,45.9 89.94,46.86 89.94,49.047 92.541,51.648 95.348,51.648 99.5,55.8
  Bottom Layer w0.4: v2@96.85,37.85 97.45,37.85 v1(100,35.3) ; 99.5,55.8 99.5,56.8 v1(100.2,57.5)
CurrentSense_LD4: Opa3_LD4.5 R11-1_LD4.1 S.2@141.5,39.3 Sw2_LD4.7 Sw3_LD4.3 | length 54.9
  Top Layer w0.3: Sw3_LD4.3@143.1,57.45 143.1,57.026 Sw3_LD4.3@143.225,56.901 ; 148.4,58.1 149.4,59.1 Sw2_LD4.7@150.6,59.1
  Top Layer w0.4: v1(135,44.2) 135.679,43.521 138,41.2 R11-1_LD4.1@139.6,39.6 ; R11-1_LD4.1@140.1,39.6 S.2@141.9,39.6 ; v2(141,37.8) 141.05,37.85 S.2@141.05,39.35 ; Sw3_LD4.3@143.1,57.45 143.15,57.5 v1(144.3,57.5) 147.8,57.5 148.4,58.1 ; v1(144.1,35.3) 144.1,30.6 144.496,30.204 144.496,26.904 145.15,26.25 Opa3_LD4.5@145.15,23.273
  Bottom Layer w0.3: v1(135,44.2) 135,45.9 134.04,46.86 134.04,49.047 136.641,51.648 139.448,51.648 143.6,55.8
  Bottom Layer w0.4: v2@140.95,37.85 141.55,37.85 v1(144.1,35.3) ; 143.6,55.8 143.6,56.8 v1(144.3,57.5)
CurrentSense_LD5: Opa3_LD5.5 R1-3_LD5.2 R11-1_LD5.1 Sw2_LD5.7 Sw3_LD5.3 | length 54.9
  Top Layer w0.3: Sw3_LD5.3@187.2,57.45 187.2,57.026 Sw3_LD5.3@187.325,56.901 ; 192.5,58.1 193.5,59.1 Sw2_LD5.7@194.7,59.1
  Top Layer w0.4: v1(179.1,44.2) 179.779,43.521 182.1,41.2 R11-1_LD5.1@183.7,39.6 ; R11-1_LD5.1@184.2,39.6 R1-3_LD5.2@186,39.6 ; v2(185.1,37.8) 185.15,37.85 R1-3_LD5.2@185.15,39.35 ; Sw3_LD5.3@187.2,57.45 187.25,57.5 v1(188.4,57.5) 191.9,57.5 192.5,58.1 ; v1(188.2,35.3) 188.2,30.6 188.596,30.204 188.596,26.904 189.25,26.25 Opa3_LD5.5@189.25,23.273
  Bottom Layer w0.3: v1(179.1,44.2) 179.1,45.9 178.14,46.86 178.14,49.047 180.741,51.648 183.548,51.648 187.7,55.8
  Bottom Layer w0.4: v2@185.05,37.85 185.65,37.85 v1(188.2,35.3) ; 187.7,55.8 187.7,56.8 v1(188.4,57.5)
CurrentSense_LD6: Opa3_LD6.5 R11-1_LD6.1 S.2@229.7,39.3 Sw2_LD6.7 Sw3_LD6.3 | length 54.9
  Top Layer w0.3: Sw3_LD6.3@231.3,57.45 231.3,57.026 Sw3_LD6.3@231.425,56.901 ; 236.6,58.1 237.6,59.1 Sw2_LD6.7@238.8,59.1
  Top Layer w0.4: v1(223.2,44.2) 223.879,43.521 226.2,41.2 R11-1_LD6.1@227.8,39.6 ; R11-1_LD6.1@228.3,39.6 S.2@230.1,39.6 ; v2(229.2,37.8) 229.25,37.85 S.2@229.25,39.35 ; Sw3_LD6.3@231.3,57.45 231.35,57.5 v1(232.5,57.5) 236,57.5 236.6,58.1 ; v1(232.3,35.3) 232.3,30.6 232.696,30.204 232.696,26.904 233.35,26.25 Opa3_LD6.5@233.35,23.273
  Bottom Layer w0.3: v1(223.2,44.2) 223.2,45.9 222.24,46.86 222.24,49.047 224.841,51.648 227.648,51.648 231.8,55.8
  Bottom Layer w0.4: v2@229.15,37.85 229.75,37.85 v1(232.3,35.3) ; 231.8,55.8 231.8,56.8 v1(232.5,57.5)
CurrentSense_LD7: Opa3_LD7.5 R11-1_LD7.1 S.2@273.8,39.3 Sw2_LD7.7 Sw3_LD7.3 | length 54.9
  Top Layer w0.3: Sw3_LD7.3@275.4,57.45 275.4,57.026 Sw3_LD7.3@275.525,56.901 ; 280.7,58.1 281.7,59.1 Sw2_LD7.7@282.9,59.1
  Top Layer w0.4: v1(267.3,44.2) 267.979,43.521 270.3,41.2 R11-1_LD7.1@271.9,39.6 ; R11-1_LD7.1@272.4,39.6 S.2@274.2,39.6 ; v2(273.3,37.8) 273.35,37.85 S.2@273.35,39.35 ; Sw3_LD7.3@275.4,57.45 275.45,57.5 v1(276.6,57.5) 280.1,57.5 280.7,58.1 ; v1(276.4,35.3) 276.4,30.6 276.796,30.204 276.796,26.904 277.45,26.25 Opa3_LD7.5@277.45,23.273
  Bottom Layer w0.3: v1(267.3,44.2) 267.3,45.9 266.34,46.86 266.34,49.047 268.941,51.648 271.748,51.648 275.9,55.8
  Bottom Layer w0.4: v2@273.25,37.85 273.85,37.85 v1(276.4,35.3) ; 275.9,55.8 275.9,56.8 v1(276.6,57.5)
CurrentSense_LD8: Opa3_LD8.5 R1-3_LD8.2 R11-1_LD8.1 Sw2_LD8.7 Sw3_LD8.3 | length 54.9
  Top Layer w0.3: Sw3_LD8.3@319.5,57.45 319.5,57.026 Sw3_LD8.3@319.625,56.901 ; 324.8,58.1 325.8,59.1 Sw2_LD8.7@327,59.1
  Top Layer w0.4: v1(311.4,44.2) 312.079,43.521 314.4,41.2 R11-1_LD8.1@316,39.6 ; R11-1_LD8.1@316.5,39.6 R1-3_LD8.2@318.3,39.6 ; v2(317.4,37.8) 317.45,37.85 R1-3_LD8.2@317.45,39.35 ; Sw3_LD8.3@319.5,57.45 319.55,57.5 v1(320.7,57.5) 324.2,57.5 324.8,58.1 ; v1(320.5,35.3) 320.5,30.6 320.896,30.204 320.896,26.904 321.55,26.25 Opa3_LD8.5@321.55,23.273
  Bottom Layer w0.3: v1(311.4,44.2) 311.4,45.9 310.44,46.86 310.44,49.047 313.041,51.648 315.848,51.648 320,55.8
  Bottom Layer w0.4: v2@317.35,37.85 317.95,37.85 v1(320.5,35.3) ; 320,55.8 320,56.8 v1(320.7,57.5)
d16: H1.10 Iso-2.2 RPD_2.1 | length 48
  Top Layer w0.3: Iso-2.2@152.04,166 152.04,168.3 ; v3(152.4,169.9) 152.4,169.754 152.04,169.394 152.04,168.3 ; RPD_2.1@153.8,168.2 152.14,168.2 152.04,168.3
  Bottom Layer w0.3: v3(152.4,169.9) 152.45,169.95 152.45,170.95 157,175.5 183.5,175.5 184.1,176.1 184.1,178.488 182.088,180.5 H1.10@180.02,180.5
d17: H1.9 Iso-2.3 RPD_3.1 | length 55.5
  Top Layer w0.3: Iso-2.3@150.77,166 150.77,170.47 151.5,171.2 153.9,171.2 ; RPD_3.1@153.9,169.8 153.9,171.2 ; v3(154.9,171.2) 153.9,171.2
  Bottom Layer w0.3: v3(154.9,171.2) 158.3,174.6 183.8,174.6 185.2,176 185.2,179.5 182.7,182 178.98,182 H1.9@177.48,180.5
d18: H1.8 Iso-2.4 RPD_4.1 | length 64.3
  Top Layer w0.3: Iso-2.4@149.5,166 149.5,171.2 150.8,172.5 156.2,172.5 v3@157.2,171.5 ; v3(157.4,171.5) 157.4,171.338 158.4,170.338 RPD_4.1@158.4,170.1
  Bottom Layer w0.3: v3@157.2,171.5 159.5,173.8 184.3,173.8 186.4,175.9 186.4,180 183.629,182.771 177.211,182.771 H1.8@174.94,180.5
d19: H1.7 Iso-2.5 RPD_5.1 | length 71.8
  Top Layer w0.3: Iso-2.5@148.23,166 148.23,171.63 149.9,173.3 158.3,173.3 v3(159.5,172.1) 159.5,171.25 159.9,170.85 RPD_5.1@159.9,170.8 ; RPD_5.1@159.5,170.9 RPD_5.1@159.6,170.8
  Bottom Layer w0.3: v3@159.6,172 160.5,172.9 185.2,172.9 187.5,175.2 187.5,180.4 184.3,183.6 175.5,183.6 H1.7@172.4,180.5
d20: H1.6 Iso-2.6 RPD_6.1 | length 75.1
  Top Layer w0.3: Iso-2.6@146.96,166 146.96,171.76 148.3,173.1 ; RPD_6.1@147.4,174.1 147.45,174.1 148.3,173.25 148.3,173.1 ; v3(163.4,171.8) 161.1,174.1 149.3,174.1 148.375,173.175 148.3,173.1 ; H1.6@169.86,180.5 171.96,182.6 180,182.6 188.514,174.086 188.514,173.586 v3(188.6,173.5)
  Bottom Layer w0.3: v3(163.4,171.8) 163.562,171.8 163.862,172.1 187.2,172.1 v3(188.6,173.5)
d21: H1.5 Iso-2.7 RPD_7.1 | length 41.7
  Top Layer w0.3: RPD_7.1@144.8,174.8 144.9,174.9 145.69,174.9 ; v3(145,180.7) 145.69,180.01 145.69,174.9 ; Iso-2.7@145.69,166 145.69,174.9
  Bottom Layer w0.3: v3(145,180.7) 148,183.7 160.7,183.7 160.8,183.6 165.8,183.6 167.32,182.08 H1.5@167.32,180.5
d22: H1.4 Iso-3.2 RPD_8.1 | length 41.8
  Top Layer w0.3: Iso-3.2@139.31,166 139.31,176.3 ; RPD_8.1@140.3,176.3 139.31,176.3 ; v3(140.6,178.8) 139.31,177.51 139.31,176.3
  Bottom Layer w0.3: v3(140.6,178.8) 146.8,178.8 150.8,182.8 163.7,182.8 164.65,181.85 164.65,180.63 H1.4@164.78,180.5
d23: H1.3 Iso-3.3 RPD_9.1 | length 42.4
  Top Layer w0.3: RPD_9.1@136.7,177.4 138.04,177.4 ; Iso-3.3@138.04,166 138.04,177.4 ; H1.3@162.24,180.5 162.15,180.59 162.15,181.85 160.7,183.3 142.1,183.3 138.04,179.24 138.04,177.4
DA1: PWM1.6 R7-4_LD1.1 Sw2_LD1.5 | length 220.6
  Top Layer w0.3: R7-4_LD1.1@10.2,66 10.3,65.9 11,65.9 11.25,65.65 11.77,66.17 11.77,82.33 8.4,85.7 8.4,87.9 11.77,91.27 11.77,102.37 v3(14.3,104.9) ; Sw2_LD1.5@13.1,58.6 15.2,58.6 v1(15.3,58.7) ; v3(148.9,148.9) 150,147.8 PWM1.6@151.7,147.8
  Bottom Layer w0.3: v1(11.5,65.4) 14.3,65.4 16.5,63.2 16.5,59.9 v1(15.3,58.7) ; v3(14.3,104.9) 14.3,113.1 46.5,145.3 65.1,145.3 66.4,146.6 149,146.6 149.6,147.2 149.6,148.324 149.424,148.5 149.3,148.5 v3(148.9,148.9)
DA2: PWM1.7 R7-4_LD2.1 Sw2_LD2.5 | length 195.3
  Top Layer w0.3: R7-4_LD2.1@54.3,66 54.4,65.9 55.1,65.9 55.35,65.65 55.87,66.17 55.87,80.902 52.7,84.072 52.7,141.7 v3(58.5,147.5) ; Sw2_LD2.5@57.2,58.6 59.3,58.6 v1(59.4,58.7) ; v3(146.4,149.3) 147.111,148.589 147.111,147.946 147.907,147.15 PWM1.7@151.7,147.15
  Bottom Layer w0.3: v1(55.6,65.4) 58.4,65.4 60.6,63.2 60.6,59.9 v1(59.4,58.7) ; v3(58.5,147.5) 60.3,149.3 v3(146.4,149.3)
DA3: PWM1.8 R7-4_LD3.1 Sw2_LD3.5 | length 145.4
  Top Layer w0.3: R7-4_LD3.1@98.4,66 98.5,65.9 99.2,65.9 99.45,65.65 99.97,66.17 99.97,73.93 98.5,75.4 98.5,113.3 v3(101,115.8) ; Sw2_LD3.5@101.3,58.6 103.4,58.6 v1(103.5,58.7) ; v3(144.6,119.6) 144.6,137.9 143.5,139 143.5,143.7 146.3,146.5 PWM1.8@151.7,146.5
  Bottom Layer w0.3: v1(99.7,65.4) 102.5,65.4 104.7,63.2 104.7,59.9 v1(103.5,58.7) ; v3(101,115.8) 104.2,119 144,119 v3(144.6,119.6)
DA4: PWM1.9 R7-4_LD4.1 Sw2_LD4.5 | length 101.9
  Top Layer w0.3: R7-4_LD4.1@142.5,66 142.6,65.9 143.3,65.9 143.55,65.65 144.07,66.17 144.07,83.53 141.8,85.8 141.8,99.6 146.8,104.6 146.8,144.6 148.05,145.85 PWM1.9@151.7,145.85 ; Sw2_LD4.5@145.4,58.6 147.5,58.6 v1(147.6,58.7)
  Bottom Layer w0.3: v1(143.8,65.4) 146.6,65.4 148.8,63.2 148.8,59.9 v1(147.6,58.7)
DA5: PWM1.10 R7-4_LD5.1 Sw2_LD5.5 | length 141.5
  Top Layer w0.3: v3(143.291,89.656) 143.291,98.591 147.9,103.2 147.9,144.3 148.8,145.2 PWM1.10@151.7,145.2 ; R7-4_LD5.1@186.6,66 186.7,65.9 187.4,65.9 187.65,65.65 188.17,66.17 188.17,85.13 v3(186.9,86.4) ; Sw2_LD5.5@189.5,58.6 191.6,58.6 v1(191.7,58.7)
  Bottom Layer w0.3: v3(143.291,89.656) 143.948,89 184.3,89 v3(186.9,86.4) ; v1(187.9,65.4) 190.7,65.4 192.9,63.2 192.9,59.9 v1(191.7,58.7)
DA6: PWM1.11 R7-4_LD6.1 Sw2_LD6.5 | length 196.7
  Top Layer w0.3: v3(148.7,100.8) 148.7,143.6 149.65,144.55 PWM1.11@151.7,144.55 ; R7-4_LD6.1@230.7,66 230.8,65.9 231.5,65.9 231.75,65.65 232.27,66.17 232.27,71.27 244.9,83.9 v3(244.9,90.6) ; Sw2_LD6.5@233.6,58.6 235.7,58.6 v1(235.8,58.7)
  Bottom Layer w0.3: v3(148.7,100.8) 149.8,101.9 164.1,101.9 165.9,103.7 182.1,103.7 183.9,101.9 190.3,101.9 192.8,99.4 196.1,99.4 196.9,100.2 239.2,100.2 244.9,94.5 v3(244.9,90.6) ; v1(232,65.4) 234.8,65.4 237,63.2 237,59.9 v1(235.8,58.7)
DA7: PWM1.12 R7-4_LD7.1 Sw2_LD7.5 | length 206.9
  Top Layer w0.3: v3(150.7,108.1) 150.639,108.161 150.639,108.711 149.8,109.55 149.8,143.4 150.3,143.9 PWM1.12@151.7,143.9 ; v3(273,88.3) 273,73.9 276.37,70.53 276.37,66.17 275.85,65.65 275.6,65.9 274.9,65.9 R7-4_LD7.1@274.8,66 ; Sw2_LD7.5@277.7,58.6 279.8,58.6 v1(279.9,58.7)
  Bottom Layer w0.3: v3(150.7,108.1) 245.2,108.1 262.8,90.5 270.8,90.5 v3(273,88.3) ; v1(276.1,65.4) 278.9,65.4 281.1,63.2 281.1,59.9 v1(279.9,58.7)
DA8: PWM1.13 R7-4_LD8.1 Sw2_LD8.5 | length 242.5
  Top Layer w0.3: PWM1.13@151.7,143.25 153.224,143.25 153.7,142.774 v3(153.7,113.5) ; v3(317.9,85) 317.9,84.924 318.3,84.524 318.3,72.8 320.47,70.63 320.47,66.17 319.95,65.65 319.7,65.9 319,65.9 R7-4_LD8.1@318.9,66 ; Sw2_LD8.5@321.8,58.6 323.9,58.6 v1(324,58.7)
  Bottom Layer w0.3: v3(153.7,113.5) 258.9,113.5 284.7,87.7 315.2,87.7 v3(317.9,85) ; v1(320.2,65.4) 323,65.4 325.2,63.2 325.2,59.9 v1(324,58.7)
DAC1: DAC_1.4 Sw2_LD1.2 | length 222.7
  Top Layer w0.3: Sw2_LD1.2@13.1,60.1 14,60.1 14.4,60.5 14.4,61.1 14.018,61.482 14.018,71.118 17.5,74.6 v3(17.5,106.3) ; v3(165.4,145.1) 165.562,145.1 166.062,144.6 DAC_1.4@168.4,144.6
  Bottom Layer w0.3: v3(17.5,106.3) 43.2,132 163.5,132 165.5,134 165.5,145 v3(165.4,145.1)
DAC2: DAC_1.13 Sw2_LD2.2 | length 204.2
  Top Layer w0.3: Sw2_LD2.2@57.2,60.1 58.1,60.1 58.5,60.5 58.5,61.1 58.118,61.482 58.118,106.118 v3(58.4,106.4) ; DAC_1.13@174.2,144.6 178.8,144.6 182.6,140.8 182.6,126.973 182,126.373 v3(182,126.3)
  Bottom Layer w0.3: v3(58.4,106.4) 78.3,126.3 v3(182,126.3)
DAC3: DAC_1.5 Sw2_LD3.2 | length 147.1
  Top Layer w0.3: Sw2_LD3.2@101.3,60.1 102.2,60.1 102.6,60.5 102.6,61.1 102.218,61.482 102.218,106.482 v3(102.2,106.5) ; v3(162.1,110.5) 162.1,112 163.8,113.7 163.8,142.5 165.25,143.95 DAC_1.5@168.4,143.95
  Bottom Layer w0.3: v3(102.2,106.5) 106.2,110.5 v3(162.1,110.5)
DAC4: DAC_1.12 Sw2_LD4.2 | length 122.7
  Top Layer w0.3: Sw2_LD4.2@145.4,60.1 146.3,60.1 146.7,60.5 146.7,61.1 146.318,61.482 146.318,83.718 v3(147,84.4) ; DAC_1.12@174.2,143.95 174.25,144 177.9,144 181.4,140.5 181.4,129.6 180.6,128.8 180.6,125.4 181.8,124.2 181.8,90.4 v3(175.9,84.5)
  Bottom Layer w0.3: v3(147,84.4) 175.8,84.4 v3(175.9,84.5)
DAC5: DAC_1.6 Sw2_LD5.2 | length 113.5
  Top Layer w0.3: v3(163.4,95.6) 163.4,110.5 165,112.1 165,142.3 165.9,143.2 167.23,143.2 167.255,143.225 168.325,143.225 DAC_1.6@168.4,143.3 ; Sw2_LD5.2@189.5,60.1 190.4,60.1 190.8,60.5 190.8,61.1 190.418,61.482 190.418,70.418 191.3,71.3 v3(191.3,90.9)
  Bottom Layer w0.3: v3(163.4,95.6) 163.4,95.4 167.719,91.081 190.824,91.081 190.89,91.015 191.185,91.015 v3(191.3,90.9)
DAC6: J1-4.2 Sw2_LD6.2 | length 153.3
  Top Layer w0.3: J1-4.2@182.7,145.5 182.8,145.4 182.8,142.8 183.742,141.858 183.742,104.428 v3(184.87,103.3) ; Sw2_LD6.2@233.6,60.1 234.5,60.1 234.9,60.5 234.9,61.1 234.518,61.482 234.518,70.018 250.3,85.8 v3(250.3,90.8)
  Bottom Layer w0.3: v3(184.87,103.3) 184.97,103.2 239.8,103.2 250.3,92.7 v3(250.3,90.8)
DAC7: DAC_1.7 Sw2_LD7.2 | length 186.6
  Top Layer w0.3: v3(166.4,110.3) 166.326,110.374 166.326,142.474 166.502,142.65 DAC_1.7@168.4,142.65 ; v3(277.3,87.5) 277.2,87.4 277.2,73.6 278.557,72.243 278.557,61.543 279,61.1 279,60.5 278.6,60.1 Sw2_LD7.2@277.7,60.1
  Bottom Layer w0.3: v3(166.4,110.3) 167,110.9 257.6,110.9 277.3,91.2 v3(277.3,87.5)
DAC8: DAC_1.10 Sw2_LD8.2 | length 211.8
  Top Layer w0.3: DAC_1.10@174.2,142.65 175.95,142.65 176.4,142.2 v3(176.4,140.3) ; Sw2_LD8.2@321.8,60.1 322.7,60.1 323.1,60.5 323.1,61.1 322.718,61.482 322.718,69.818 325.1,72.2 v3(325.1,88.7)
  Bottom Layer w0.3: v3(176.4,140.3) 176.5,140.2 176.5,139.4 179.75,136.15 187.15,136.15 190.8,132.5 190.8,121.9 192.3,120.4 258.7,120.4 288.3,90.8 319.1,90.8 321.2,88.7 v3(325.1,88.7)
DAC_1_E: H1.15 R3-1.1 | length 10.6
  Top Layer w0.3: H1.15@169.86,177.96 169.86,173.84 172.3,171.4 R3-1.1@172.3,168.4
DAC_6_A: DAC_1.11 J1-4.1 | length 7.3
  Top Layer w0.3: DAC_1.11@174.2,143.3 176.8,143.3 v3(177.2,142.9) ; J1-4.1@180.1,145.44 J1-4.1@180.16,145.5
  Bottom Layer w0.3: v3(177.2,142.9) 177.315,143.015 177.675,143.015 J1-4.1@180.16,145.5
DAC_Fast: J1-4.3 OpAmp-2.1 R3-3.1 | length 21.1
  Top Layer w0.3: 174.3,148.3 174.8,147.8 v3(174.9,147.8)
  Top Layer w0.4: R3-3.1@171.6,148.5 171.8,148.5 172.3,148 172.6,148 172.7,147.9 173.9,147.9 174.3,148.3 174.3,151.4 174.7,151.8 174.9,151.8 175.25,152.15 OpAmp-2.1@175.25,153.7
  Bottom Layer w0.3: v3(174.9,147.8) 175.9,146.8 183.94,146.8 J1-4.3@185.24,145.5
DB1: PWM1.15 R7-5_LD1.1 Sw3_LD1.6 | length 218.1
  Top Layer w0.3: R7-5_LD1.1@7.1,60.8 R7-5_LD1.1@7.2,60.9 ; R7-5_LD1.1@7.4,60.8 7.4,61.2 ; Sw3_LD1.6@8.9,61.2 7.4,61.2 ; v3(16.5,109.9) 10,103.4 10,91.8 6.6,88.4 6.6,85 10,81.6 10,72.7 6.9,69.6 6.9,63 7.4,62.5 7.4,61.2 ; PWM1.15@158.1,142.6 158.575,142.6 158.6,142.575 158.6,138.4 159.1,137.9 v3(159.1,136.6)
  Bottom Layer w0.3: v3(16.5,109.9) 41.8,135.2 157.7,135.2 v3(159.1,136.6)
DB2: PWM1.16 R7-5_LD2.1 Sw3_LD2.6 | length 196.5
  Top Layer w0.3: v3(51,143) 51,82.9 52.7,81.2 52.7,71.6 51,69.9 51,63 51.5,62.5 51.5,61.2 ; R7-5_LD2.1@51.2,60.8 R7-5_LD2.1@51.3,60.9 ; R7-5_LD2.1@51.5,60.8 51.5,61.2 ; Sw3_LD2.6@53,61.2 51.5,61.2 ; v3(156.7,140.8) 156.7,140.962 156.2,141.462 156.2,143.049 156.376,143.225 158.075,143.225 PWM1.16@158.1,143.25
  Bottom Layer w0.3: v3(51,143) 51.1,142.9 148.2,142.9 150.3,140.8 v3(156.7,140.8)
DB3: PWM1.17 R7-5_LD3.1 Sw3_LD3.6 | length 146.6
  Top Layer w0.3: R7-5_LD3.1@95.3,60.8 R7-5_LD3.1@95.4,60.9 ; R7-5_LD3.1@95.6,60.8 95.6,61.2 ; Sw3_LD3.6@97.1,61.2 95.6,61.2 ; v3(104.9,120.9) 103.8,120.9 97,114.1 97,75.9 95.1,74 95.1,63 95.6,62.5 95.6,61.2 ; PWM1.17@158.1,143.9 159.8,143.9 160.3,143.4 160.3,141.5 159.5,140.7 159.5,139.5 160.8,138.2 160.8,131.081 160.4,130.681 v3(160.4,123.4)
  Bottom Layer w0.3: v3(104.9,120.9) 141.7,120.9 144.2,123.4 v3(160.4,123.4)
DB4: PWM1.18 R7-5_LD4.1 Sw3_LD4.6 | length 108.2
  Top Layer w0.3: R7-5_LD4.1@139.4,60.8 R7-5_LD4.1@139.5,60.9 ; R7-5_LD4.1@139.7,60.8 139.7,61.2 ; Sw3_LD4.6@141.2,61.2 139.7,61.2 ; v3(145.4,140.4) 145.4,120.7 146,120.1 146,105.6 140.6,100.2 140.6,83 139.2,81.6 139.2,63 139.7,62.5 139.7,61.2 ; PWM1.18@158.1,144.55 160.35,144.55 161,143.9 161,140.576 160.6,140.176 v3(160.6,140.1)
  Bottom Layer w0.3: v3(145.4,140.4) 147.1,138.7 159.4,138.7 159.943,139.243 159.943,139.443 v3(160.6,140.1)
DB5: PWM1.19 R7-5_LD5.1 Sw3_LD5.6 | length 112.7
  Top Layer w0.3: PWM1.19@158.1,145.2 161.5,145.2 161.817,144.883 161.817,121.317 160.5,120 160.5,88.4 v3(161,87.9) ; v3(183.4,87.4) 183.3,87.3 183.3,63 183.8,62.5 183.8,61.2 ; R7-5_LD5.1@183.5,60.8 R7-5_LD5.1@183.6,60.9 ; R7-5_LD5.1@183.8,60.8 183.8,61.2 ; Sw3_LD5.6@185.3,61.2 183.8,61.2
  Bottom Layer w0.3: v3(161,87.9) 182.738,87.9 183.238,87.4 v3(183.4,87.4)
DB6: PWM1.20 R7-5_LD6.1 Sw3_LD6.6 | length 180.5
  Top Layer w0.3: v3(157.5,99.8) 157.5,137.6 155.4,139.7 155.4,144.9 156.35,145.85 PWM1.20@158.1,145.85 ; R7-5_LD6.1@227.6,60.8 R7-5_LD6.1@227.7,60.9 ; R7-5_LD6.1@227.9,60.8 227.9,61.2 ; Sw3_LD6.6@229.4,61.2 227.9,61.2 ; v3(242.4,90.7) 242.4,83.2 230.8,71.6 227.9,71.6 227.4,71.1 227.4,63 227.9,62.5 227.9,61.2
  Bottom Layer w0.3: v3(157.5,99.8) 164.7,99.8 167.2,102.3 180.5,102.3 182.4,100.4 188.6,100.4 198.2,90.8 206.2,90.8 207.5,92.1 241,92.1 v3(242.4,90.7)
DB7: PWM1.21 R7-5_LD7.1 Sw3_LD7.6 | length 193.9
  Top Layer w0.3: v3(155.5,106.5) 155.5,126.281 154.7,127.081 154.7,145.5 155.7,146.5 PWM1.21@158.1,146.5 ; v3(262.2,88.8) 265.9,85.1 271,85.1 271.5,84.6 271.5,63 272,62.5 272,61.2 ; R7-5_LD7.1@271.7,60.8 R7-5_LD7.1@271.8,60.9 ; R7-5_LD7.1@272,60.8 272,61.2 ; Sw3_LD7.6@273.5,61.2 272,61.2
  Bottom Layer w0.3: v3(155.5,106.5) 244.6,106.5 262.2,88.9 v3(262.2,88.8)